# Altium PCB T_B 2.PcbDoc
Units mil, origin at the board's own origin, x right, y up, seen from the top; angles counter-clockwise.
Board outline 5472.44 x 925.2 mil, 2 copper layers (Top Layer, Bottom Layer); 42 components, 28 nets, 106 pads, 33 vias.
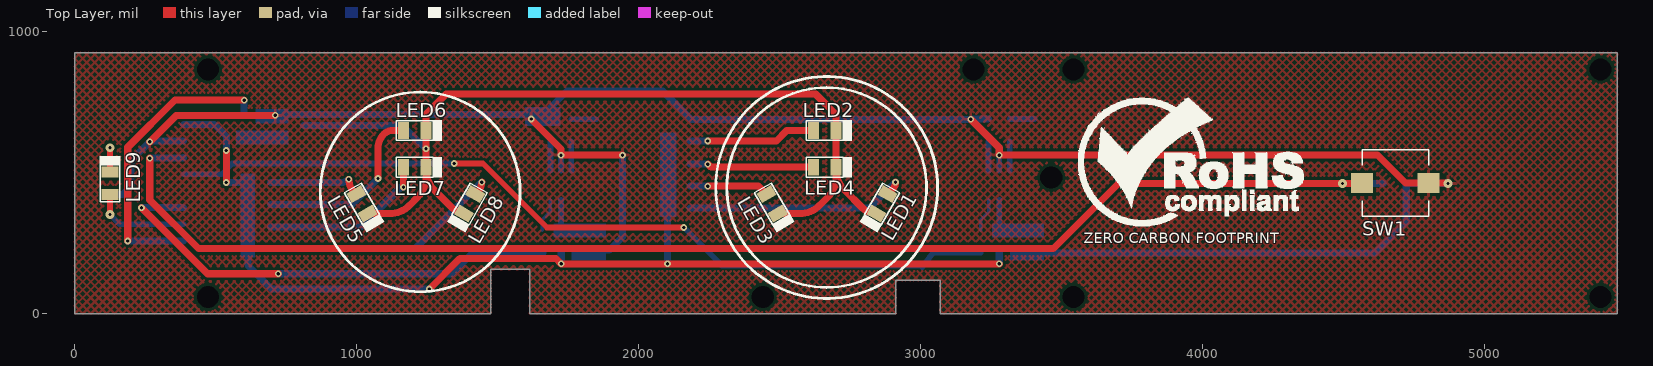
[diagram p0: Top Layer view]
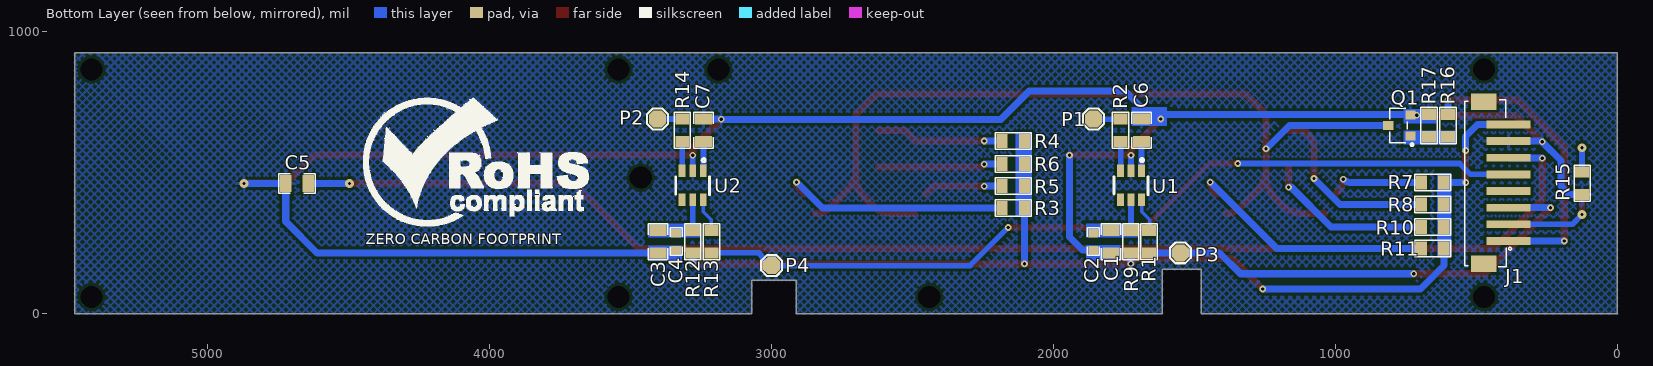
[diagram p1: Bottom Layer view, seen from below]
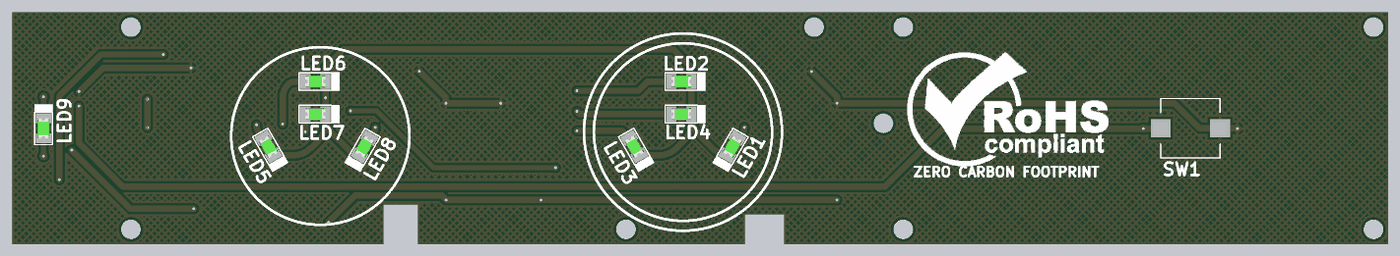
[diagram p2: 3D render of the assembled board from above, using the file's embedded part models]
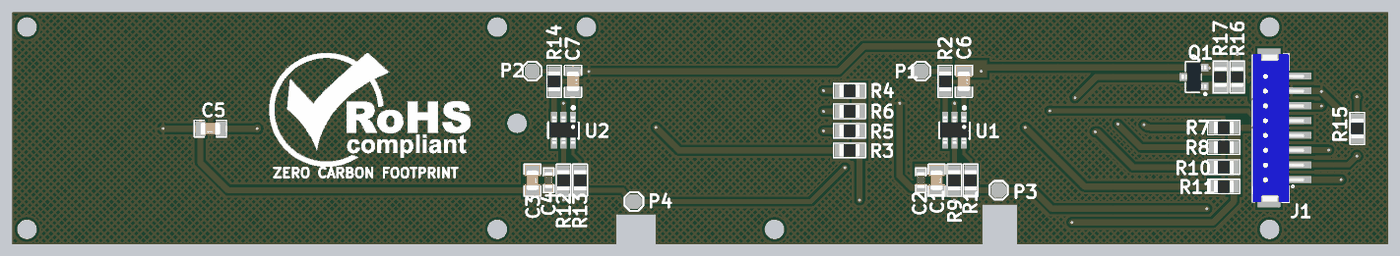
[diagram p3: 3D render of the assembled board from below, using the file's embedded part models]

## Layer stack, top to bottom
Top Solder: solder mask 0.4, Solder Resist, Dk 3.5
Top Layer: signal copper 1.4
Dielectric 1: dielectric 12.6, FR-4, Dk 4.8
Bottom Layer: signal copper 1.4
Bottom Solder: solder mask 0.4, Solder Resist, Dk 3.5

## Board outline
0,-1.2 0,924 5472.44,924 5472.44,-1.2 3070.87,-1.2 3070.87,116.91 2913.39,116.91 2913.39,-1.2 1614.17,-1.2 1614.17,156.28 1476.38,156.28 1476.38,-1.2

## Design rules (kind name [scope] priority, off if disabled: settings)
Clearance [All] p1: gap=10 ignorepadtopadclearanceinfootprint=FALSE except(0: Arc-Hole Track-Hole SMDPad-Hole THPad-Hole Via-Hole Fill-Hole Poly-Hole Region-Hole Text-Hole)
ComponentClearance [All] p1: gap=0 collisioncheckmode=3 verticalgap=0 showdistances=FALSE
HoleSize [All] p1: absolutevalues=TRUE maxlimit=1000 minlimit=1 maxpercent=80.000 minpercent=20.000
HoleToHoleClearance [All] p1: gap=0 allowstackedmicrovias=TRUE
MinimumSolderMaskSliver [All] p1: minsoldermaskwidth=0
PolygonConnect [All] p1: connectstyle=Relief reliefconductorwidth=10 reliefentries=4 polygonreliefangle="90 Angle" airgapwidth=10
RoutingVias [All] p1: holewidth=11.81 width=23.62 viastyle="Through Hole" minholewidth=7.87 minwidth=17.72 maxholewidth=11.81 maxwidth=23.62
SilkToSilkClearance [All] p1: silktosilkclearance=0
SilkToSolderMaskClearance [IsPad] p1: minsilkscreentomaskgap=0 clearancetoexposedcopper=TRUE
SolderMaskExpansion SolderMaskExpansion_1 [IsVia] p1: expansion=4 soldermaskfromhole=TRUE
SolderMaskExpansion [Not IsVia] p2: expansion=4
Width [All] p1: maxlimit=100 minlimit=10 preferedwidth=12 minimp=50.000000 maximp=50.000000 favimp=50.000000
24 further rules are at their usual default settings.

## Classes and differential pairs
component class U_Touch_Sensor_Section: C1 C2 C3 C4 C6 C7 P1 P2 P3 P4 R1 R2 R9 R12 R13 R14 U1 U2
component class U_LED_Section: C5 J1 LED1 LED2 LED3 LED4 LED5 LED6 LED7 LED8 LED9 Q1 R3 R4 R5 R6 R7 R8 R10 R11 R15 R16 SW1

## Components (designator, comment, footprint, x,y, rotation, side; value= is the part's Value field where it differs from the comment)
C1 "0.1uF" Cap0805 1796,254 r270 bottom
C2 "10uF" Cap0603 1859,254 r270 bottom
C3 "0.1uF" Cap0805 3403,254 r270 bottom
C4 "10uF" Cap0603 3339,254 r270 bottom
C5 "0.1uF" Cap0805 4684,460 r0 bottom
C6 "0.1uF" Cap0805 1688,649 r270 bottom
C7 "0.1uF" Cap0805 3242,649 r270 bottom
J1 "B8B-ZR-SM4-TF(LF)(SN)" B8B-ZR-SM4-TF(LF)(SN) 430,462.9 r90 bottom locked
LED1 "150080GS75000" "LED 0805" 2864,388 r240 top
LED2 "150080GS75000" "LED 0805" 2661,648 r0 top
LED3 "150080GS75000" "LED 0805" 2474,388 r300 top
LED4 "150080GS75000" "LED 0805" 2661,518 r0 top
LED5 "150080GS75000" "LED 0805" 1019,388 r300 top
LED6 "150080GS75000" "LED 0805" 1206,648 r0 top
LED7 "150080GS75000" "LED 0805" 1206,518 r0 top
LED8 "150080GS75000" "LED 0805" 1401,388 r240 top
LED9 "150080GS75000" "LED 0805" 125,461 r90 top locked
P1 "Test Point" "TEST POINT" 1858,689 r180 bottom
P2 "Test Point" "TEST POINT" 3405,689 r180 bottom
P3 "Test Point" "TEST POINT" 1550,214 r180 bottom
P4 "Test Point" "TEST POINT" 3000,169 r180 bottom
Q1 "S8050" sot-23 773,666 r90 bottom
R1 "1K" "RES 0805" 1661,254 r90 bottom
R2 "10K" "RES 0805" 1762,649 r270 bottom
R3 "100R" "RES 0805" 2143,373 r180 bottom
R4 "100R" "RES 0805" 2143,611 r180 bottom
R5 "100R" "RES 0805" 2143,451 r180 bottom
R6 "100R" "RES 0805" 2143,529 r180 bottom
R7 "100R" "RES 0805" 655,464 r180 bottom
R8 "100R" "RES 0805" 655,386 r180 bottom
R9 "100R" "RES 0805" 1726,254 r270 bottom
R10 "100R" "RES 0805" 655,306 r180 bottom
R11 "100R" "RES 0805" 655,229 r180 bottom
R12 "100R" "RES 0805" 3280,254 r270 bottom
R13 "10K" "RES 0805" 3214,254 r90 bottom
R14 "1K" "RES 0805" 3317,649 r270 bottom
R15 "100R" "RES 0805" 124,461 r90 bottom
R16 "1K5" "RES 0805" 601,666 r90 bottom
R17 "10K" "RES 0805" 668,666 r90 bottom
SW1 "TVFU03" TVFU03 4685.04,461.4 r0 top locked value=Custom
U1 "RH6015D" SOT-23-6 1725,454 r270 bottom value=Custom
U2 "RH6015D" SOT-23-6 3280,454 r270 bottom value=Custom

## Footprints (in the part's own frame and the unit in brackets; to place one, negate y for a bottom-side part, rotate by r counter-clockwise, add the part's x,y. Pads: shape width x height; smd on the part's side, far side on the other; paste and mask are expansions set on the pad)
B8B-ZR-SM4-TF(LF)(SN) [mm] "ZH Header Male Pin 0.059\"(1.50mm) 8 SMD,P=1.5mm Wire To Board / Wire To Wire Connector RoHS"
  rect 0.7x4 smd: 1(-5.25,-1.125) 2(-3.75,-1.125) 3(-2.25,-1.125) 4(-0.75,-1.125) 5(0.75,-1.125) 6(2.25,-1.125) 7(3.75,-1.125) 8(5.25,-1.125)
  rect 1.5x2.3 smd: MP1(7.3,1.125) MP2(-7.3,1.125)
  silkscreen extent -7.57,-1.4 7.49,2.82, body extent -7.53,-2.41 7.47,2.79, height 5
Cap0603 [mil]
  rect 30x35 smd mask+2.36: 1(-30,0) 2(30,0)
  silkscreen extent -49,-21 49,21, body extent -32,-16 31,16, height 34
Cap0805 [mil] "SMD 0805"
  rect 40x60 smd mask+2.76: 1(-40,0) 2(40,0)
  silkscreen extent -64,-34 64,34, body extent -39,-25 39,25, height 30
"LED 0805" [mil]
  rect 40x60 smd: 1(-39.99,0.01) 2(40.01,0.01)
  silkscreen extent -65,-37 96,37, body extent -40,-25 40,25, height 43
"RES 0805" [mil] "SMD 0805"
  rect 40x50 smd: 1(-40,0) 2(40,0)
  silkscreen extent -64,-29 64,29, body extent -39,-25 39,24, height 24
sot-23 [mm]
  rect 0.82x0.92 smd: 1(-0.95,-1) 2(0.95,-1) 3(0,1)
  silkscreen extent -1.82,-1.23 1.56,0.86, body extent -1.5,-1.25 1.5,1.25, height 1.1
SOT-23-6 [mm] "IC BAT CHG LI-ION 1 CELL SOT23-6"
  rect 1.12x0.62 smd: 1(-1.3,0.95) 2(-1.3,0) 3(-1.3,-0.95) 4(1.3,-0.95) 5(1.3,0) 6(1.3,0.95)
  silkscreen extent -2.4,-1.52 0.86,1.52, body extent -1.4,-1.45 1.4,1.45, height 1.44
"TEST POINT" [mil]
  oct 60x60 smd: 1(0,0)
  silkscreen extent -37,-37 37,37
TVFU03 [mm]
  rect 2x1.8 smd: 1(-3,0) 2(3,0)
  silkscreen extent -3,-3 3,3

## Part data
C1 C3 C5 C6 C7: library part 0805B104K500CT, "CAP CER 0.1UF 50V X7R 0805", Capacitance=100nF, Case Code (Imperial)=0805, Case Code (Metric)=2012, Dielectric=X7R, Manufacturer="Walsin Technologies", Max Operating Temperature=125°C, Min Operating Temperature=-55°C, Supplier Part Number 1=1292-1647-1-ND, Tolerance=10%, Voltage=50V, Case/Package=0805, Category="Ceramic Capacitors", ComponentLink1Description=http://www.farnell.com/datasheets/2340522.pdf?src-supplier=Farnell, ComponentLink1URL=http://www.farnell.com/datasheets/2340522.pdf?src-supplier=Farnell, ComponentLink2Description=http://components.arrow.com/part/dataview/0323_00650840?src-supplier=Arrow+Europe, ComponentLink2URL=http://components.arrow.com/part/dataview/0323_00650840?src-supplier=Arrow+Europe, ComponentLink3Description=https://www.verical.com/server-webapp/html/getDatasheet?partID=414849&src-supplier=Verical, ComponentLink3URL=https://www.verical.com/server-webapp/html/getDatasheet?partID=414849&src-supplier=Verical, ComponentLink4Description=http://www.farnell.com/datasheets/2340522.pdf?src-supplier=Element14, ComponentLink4URL=http://www.farnell.com/datasheets/2340522.pdf?src-supplier=Element14, ComponentLink5Description=http://www.passivecomponent.com/wp-content/uploads/2018/10/MLCC.pdf?src-supplier=Digi-Key, ComponentLink5URL=http://www.passivecomponent.com/wp-content/uploads/2018/10/MLCC.pdf?src-supplier=Digi-Key, ComponentLink6Description=http://www.passivecomponent.com/indexsea/0805B104K500CT-IB.pdf?src-supplier=Digi-Key, ComponentLink6URL=http://www.passivecomponent.com/indexsea/0805B104K500CT-IB.pdf?src-supplier=Digi-Key, ComponentLink7Description=http://www.farnell.com/datasheets/2340522.pdf?src-supplier=Newark, ComponentLink7URL=http://www.farnell.com/datasheets/2340522.pdf?src-supplier=Newark, Depth=1.25mm, Lead Free="Lead Free", Length=2mm, Manufacturer Part Number=0805B104K500CT, Packaging="Tape and Reel", Pricing 1="1=0.12000, 10=0.08600, 50=0.04900, 100=0.04050, 500=0.02842, 1000=0.02352 (USD)", Radiation Hardening=No, REACH SVHC=Unknown, RoHS=Yes, Stock 1=1274242, Supplier 1=Digi-Key, Voltage Rating=50V, Voltage Rating (DC)=50V
C2 C4: library part C1608X5R1E106M080AC, "CAP CER 10UF 25V X5R 0603", Case Code (Imperial)=0603, Case Code (Metric)=1608, Dielectric=X5R, Dielectric Material=Ceramic, Manufacturer=TDK, Max Operating Temperature=85°C, Min Operating Temperature=-55°C, Package Quantity=1, Supplier Part Number 1=445-9015-1-ND, Tolerance=20%, Voltage Rating=25V, Capacitance=10uF, Case/Package=0603, Category="Ceramic Capacitors", ComponentLink1Description=http://components.arrow.com/part/dataview/0323_06887183?src-supplier=Arrow+Europe, ComponentLink1URL=http://components.arrow.com/part/dataview/0323_06887183?src-supplier=Arrow+Europe, ComponentLink2Description=http://www.farnell.com/datasheets/2792994.pdf?src-supplier=Farnell, ComponentLink2URL=http://www.farnell.com/datasheets/2792994.pdf?src-supplier=Farnell, ComponentLink3Description=http://www.farnell.com/datasheets/2291921.pdf?src-supplier=Avnet, ComponentLink3URL=http://www.farnell.com/datasheets/2291921.pdf?src-supplier=Avnet, ComponentLink4Description=http://www.farnell.com/datasheets/1470445.pdf?src-supplier=Newark, ComponentLink4URL=http://www.farnell.com/datasheets/1470445.pdf?src-supplier=Newark, ComponentLink5Description=http://www.farnell.com/datasheets/2291921.pdf?src-supplier=Newark, ComponentLink5URL=http://www.farnell.com/datasheets/2291921.pdf?src-supplier=Newark, ComponentLink6Description=http://www.farnell.com/datasheets/2792994.pdf?src-supplier=Element14, ComponentLink6URL=http://www.farnell.com/datasheets/2792994.pdf?src-supplier=Element14, ComponentLink7Description=http://www.farnell.com/datasheets/1913358.pdf?src-supplier=Element14, ComponentLink7URL=http://www.farnell.com/datasheets/1913358.pdf?src-supplier=Element14, ComponentLink8Description=https://product.tdk.com/info/en/catalog/datasheets/mlcc_commercial_general_en.pdf?src-supplier=Digi-Key, ComponentLink8URL=https://product.tdk.com/info/en/catalog/datasheets/mlcc_commercial_general_en.pdf?src-supplier=Digi-Key, ComponentLink9Description=http://www.farnell.com/datasheets/2291921.pdf?src-supplier=RSComponents, ComponentLink9URL=http://www.farnell.com/datasheets/2291921.pdf?src-supplier=RSComponents, ComponentLink10Description=http://www.farnell.com/datasheets/2291921.pdf?src-supplier=Verical, ComponentLink10URL=http://www.farnell.com/datasheets/2291921.pdf?src-supplier=Verical, ComponentLink11Description=http://www.farnell.com/datasheets/2291921.pdf?src-supplier=Mouser, ComponentLink11URL=http://www.farnell.com/datasheets/2291921.pdf?src-supplier=Mouser, ComponentLink12Description=http://www.farnell.com/datasheets/2792994.pdf?src-supplier=Newark, ComponentLink12URL=http://www.farnell.com/datasheets/2792994.pdf?src-supplier=Newark, ComponentLink13Description=http://www.farnell.com/datasheets/2291921.pdf?src-supplier=Quest, ComponentLink13URL=http://www.farnell.com/datasheets/2291921.pdf?src-supplier=Quest, ComponentLink14Description=http://www.farnell.com/datasheets/2291921.pdf?src-supplier=TTI, ComponentLink14URL=http://www.farnell.com/datasheets/2291921.pdf?src-supplier=TTI, Construction=Flat, Depth=0.8mm, Height=0.8mm, Lead Free="Lead Free", Length=1.6mm, Manufacturer Part Number=C1608X5R1E106M080AC, Mount="Surface Mount", Packaging="Tape and Reel", Pricing 1="1=0.86000, 10=0.60700, 50=0.45920, 100=0.39990, 500=0.29624, 1000=0.25180 (USD)", REACH SVHC="No SVHC", Resistor Type=Ceramic, RoHS=Yes, RoHS Compliant=Yes, Series=C, Stock 1=217631, Supplier 1=Digi-Key, Termination=SMD/SMT, Thickness=0.039inch, Voltage Rating (DC)=25V, Weight=7.1E-05oz, Width=0.8mm
J1: "Conn Shrouded Header HDR 8 POS 1.5mm Solder ST SMD T/R", Color=Natural, Contact Resistance=30mR, Current Rating=1A, Housing Color=Beige, Manufacturer=JST, Max Operating Temperature=85°C, Max Voltage Rating (AC)=50V, Min Operating Temperature=-25°C, Supplier Part Number 1=455-1687-1-ND, Category="Board to Board Connectors", ComponentLink1Description=https://datasheet.ciiva.com/26894/getdatasheetpartid-640747-26894507.pdf?src-supplier=Verical, ComponentLink1URL=https://datasheet.ciiva.com/26894/getdatasheetpartid-640747-26894507.pdf?src-supplier=Verical, ComponentLink2Description=https://datasheet.ciiva.com/16418/ezr-16418253.pdf?src-supplier=Future+Electronics, ComponentLink2URL=https://datasheet.ciiva.com/16418/ezr-16418253.pdf?src-supplier=Future+Electronics, Connector Type="Male Pin", Contact Material=Tin,Brass, Contact Plating=Tin,Copper, Depth=6.5mm, Fastening Type=Detent, Gender=Male, Height=7.2mm, Housing Material=Polyamide, Lead Free="Lead Free", Length=15mm, Manufacturer Part Number=B8B-ZR-SM4-TF(LF)(SN), Max Current Rating=1A, Mount="Surface Mount", Number of Contacts=8, Number of Positions=8, Number of Rows=1, Orientation="Right Angle", Packaging="Tape and Reel", Pitch=1.5mm, Pricing 1="1=0.80000, 10=0.70700, 100=0.60970, 500=0.49886 (USD)", RoHS=Yes, Supplier 1=Digi-Key, Termination=Solder, Width=3.5mm
LED1 LED2 LED3 LED4 LED5 LED6 LED7 LED8 LED9: "LED GREEN CLEAR 0805 SMD", Case Code (Imperial)=0805, Case Code (Metric)=2012, Color=Green, Forward Current=30mA, Forward Voltage=3.2V, Manufacturer="Wurth Electronics", Max Operating Temperature=85°C, Min Operating Temperature=-40°C, Package Quantity=4000, Supplier Part Number 1=732-4983-1-ND, Test Current=20mA, Case/Package=0805, Category=LEDs, ComponentLink1Description=https://datasheet.ciiva.com/29563/150080gs75000-29563008.pdf?src-supplier=Digi-Key, ComponentLink1URL=https://datasheet.ciiva.com/29563/150080gs75000-29563008.pdf?src-supplier=Digi-Key, ComponentLink2Description=https://datasheet.ciiva.com/29279/759434-da-01-en-chipled-0805-w-kl-gruen-150080gs75000-29279039.pdf?src-supplier=Conrad, ComponentLink2URL=https://datasheet.ciiva.com/29279/759434-da-01-en-chipled-0805-w-kl-gruen-150080gs75000-29279039.pdf?src-supplier=Conrad, Dominant Wavelength=520nm, Height=0.7mm, Length=2mm, Lens Style=Clear,Rectangular, Luminous Intensity=450mcd, Manufacturer Part Number=150080GS75000, Mount="Surface Mount", Packaging="Cut Tape", Pricing 1="1=0.18000, 50=0.16500, 100=0.14200, 500=0.12300 (USD)", REACH SVHC=Unknown, RoHS=Yes, RoHS Compliant=Yes, Stock 1=96823, Supplier 1=Digi-Key, Viewing Angle=140°, Wavelength=520nm, Width=1.25mm
P1 P2 P3 P4: library part "TEST POINT", "Test Point ON"
Q1: "NPN 500mA 25V 300mW SOT-23(SOT-23-3) Bipolar Transistors - BJT RoHS", Current - Collector (Ic) (Max)=500mA, Manufacturer=Shikues, Package=SOT-23(SOT-23-3), Power-max=300mW, Voltage - Collector Emitter Breakdown (Max)=25V, Transistor Type=NPN
R1 R14: library part CRCW08051K00JNEB, "RES SMD 1K OHM 5% 1/8W 0805", Case Code (Imperial)=0805, Case Code (Metric)=2012, Manufacturer="Vishay Dale", Max Operating Temperature=155°C, Max Power Dissipation=125mW, Min Operating Temperature=-55°C, Package Quantity=10000, Resistance=1kR, Resistor Type="Thick Film", Supplier Part Number 1=541-CRCW08051K00JNEBCT-ND, Temperature Coefficient=200ppm/°C, Tolerance=5%, Voltage Rating=150V, Case/Package=0805, Category="Chip SMD Resistors", ComponentLink1Description=https://datasheet.ciiva.com/5548/dcrcwe3-109170-5548326.pdf?src-supplier=Mouser, ComponentLink1URL=https://datasheet.ciiva.com/5548/dcrcwe3-109170-5548326.pdf?src-supplier=Mouser, ComponentLink2Description=https://datasheet.ciiva.com/28621/1747939-28621434.pdf?src-supplier=Element14, ComponentLink2URL=https://datasheet.ciiva.com/28621/1747939-28621434.pdf?src-supplier=Element14, Contact Plating=Tin, Features="Automotive AEC-Q200", Height=0.02inch, Lead Free="Lead Free", Length=0.079inch, Manufacturer Part Number=CRCW08051K00JNEB, Number of Pins=2, Number of Terminations=2, Packaging="Tape and Reel", Power Rating=125mW, Pricing 1="1=0.10000, 10=0.05000, 100=0.02040, 1000=0.00914, 2500=0.00794, 5000=0.00656 (USD)", Radiation Hardening=No, REACH SVHC=Unknown, RoHS=Yes, Stock 1=4389, Supplier 1=Digi-Key, Termination=SMD/SMT, Voltage Rating (DC)=150V, Weight=0.000194oz, Width=0.049inch
R2 R13 R17: library part RMCF0805FT10K0, "RES 10K OHM 1% 1/8W 0805", Case Code (Imperial)=0805, Case Code (Metric)=2012, Manufacturer="Stackpole Electronics", Max Operating Temperature=155°C, Max Power Dissipation=125mW, Min Operating Temperature=-55°C, Resistance=10kR, Resistor Type="Thick Film", Supplier Part Number 1=RMCF0805FT10K0CT-ND, Temperature Coefficient=100ppm/°C, Tolerance=1%, Case/Package=0805, Category="Chip SMD Resistors", ComponentLink1Description=https://datasheet.ciiva.com/15193/getdatasheetpartid-362046-15193525.pdf?src-supplier=Verical, ComponentLink1URL=https://datasheet.ciiva.com/15193/getdatasheetpartid-362046-15193525.pdf?src-supplier=Verical, Construction=Rectangular, Contact Plating=Tin,Matte, Depth=1.25mm, Features="Automotive AEC-Q200", Height=0.026inch, Lead Free="Lead Free", Length=2mm, Manufacturer Part Number=RMCF0805FT10K0, Military Standard=Not, Mount="Surface Mount", Number of Terminations=2, Packaging="Tape and Reel", Power Rating=125mW, Pricing 1="1=0.10000, 10=0.02700, 100=0.01090, 1000=0.00488, 2500=0.00423 (USD)", Radiation Hardening=No, RoHS=Yes, RoHS Compliant=Yes, Series=RMCF, Size Code=0805, Stock 1=308321, Supplier 1=Digi-Key, Width=0.049inch
R3 R4 R5 R6 R7 R8 R9 R10 R11 R12 R15: library part ERA6VEB1000V, "Res SMD 100 Ohm 0.10% 1/8W 0805", Manufacturer=Panasonic, Manufacturer Part Number=ERA-6VEB1000V, Supplier Part Number 1=10-ERA-6VEB1000VCT-ND, Category="Chip SMD Resistors", Pricing 1="1=0.56000, 10=0.46700, 100=0.31350, 1000=0.18342, 2500=0.18142 (USD)", RoHS=No, Stock 1=2703, Supplier 1=Digi-Key
R16: library part RC0805JR-071K5L, "RES SMD 1K5 0.125W ±5% 0805", Case Code (Imperial)=0805, Case Code (Metric)=2012, Manufacturer=Yageo, Max Operating Temperature=155°C, Max Power Dissipation=125mW, Min Operating Temperature=-55°C, Package Quantity=1, Resistance=1.5kR, Resistance Tolerance=5%, Resistor Type="Thick Film", Supplier Part Number 1=1655711, Temperature Coefficient=100ppm/°C, Voltage Rating=150V, Case/Package=0805, Category="Chip SMD Resistors", ComponentLink1Description=https://datasheet.ciiva.com/2456/pyu-r-int-thick-7-2456073.pdf?src-supplier=Digi-Key, ComponentLink1URL=https://datasheet.ciiva.com/2456/pyu-r-int-thick-7-2456073.pdf?src-supplier=Digi-Key, ComponentLink2Description=https://datasheet.ciiva.com/2456/pyu-r-int-thick-7-2456074.pdf?src-supplier=Digi-Key, ComponentLink2URL=https://datasheet.ciiva.com/2456/pyu-r-int-thick-7-2456074.pdf?src-supplier=Digi-Key, ComponentLink3Description=https://datasheet.ciiva.com/17026/rc0805-17026842.pdf?src-supplier=Future+Electronics, ComponentLink3URL=https://datasheet.ciiva.com/17026/rc0805-17026842.pdf?src-supplier=Future+Electronics, ComponentLink4Description=https://datasheet.ciiva.com/46395/444164-46395130.pdf?src-supplier=Element14, ComponentLink4URL=https://datasheet.ciiva.com/46395/444164-46395130.pdf?src-supplier=Element14, ComponentLink5Description=https://datasheet.ciiva.com/2456/pyu-r-int-thick-7-2456075.pdf?src-supplier=Digi-Key, ComponentLink5URL=https://datasheet.ciiva.com/2456/pyu-r-int-thick-7-2456075.pdf?src-supplier=Digi-Key, Construction=Rectangular, Contact Plating=Tin,Matte,Lead, Depth=1.25mm, Features="Moisture Resistant", Height=0.024inch, Lead Free="Lead Free", Length=0.079inch, Manufacturer Part Number=RC0805JR-071K5L, Military Standard=Not, Number of Terminations=2, Packaging="Tape and Reel", Power Rating=125mW, Pricing 1="5000=0.00390, 20000=0.00330, 75000=0.00320, 125000=0.00320, 250000=0.00310 (USD)", Radiation Hardening=No, REACH SVHC=Unknown, RoHS=Yes, RoHS Compliant=Yes, Series=RC, Size Code=0805, Stock 1=115000, Supplier 1="Future Electronics", Termination=SMD/SMT, Tolerance=5%, Width=0.049inch
SW1: "6mm 2 pin smd soft touch long travel silent tact switch", Manufacturer="Zhejiang, China", Package=Custom, ComponentLink1Description="Supplier Link", ComponentLink1URL=https://www.alibaba.com/product-detail/6mm-2-pin-smd-soft-touch_324641074.html, Manufacturer Part No=TVFU03
U1 U2: "SOT-23-6L Touch Sensors RoHS", Manufacturer="RONGHE Microelectronics", Package=SOT-23-6, Manufacturer Part No=RH6015D

## Free pads (board coordinates)
  round 0 hole 78.74 unplated: 1(5413.39,864.94) 2(3188.98,864.94) 3(3543.31,864.94) 4(5413.39,57.86) 5(3464.57,481.09) 6(3543.31,57.86) 8(2440.95,57.86) 9(472.44,864.94) 10(472.44,57.86)

## Via types
v1: diameter 23.62, hole 11.81, Top Layer to Bottom Layer, tented both sides, 29 vias
v2: diameter 31.5, hole 11.81, Top Layer to Bottom Layer, tented both sides, 4 vias

## Nets (pads, with @x,y where several pads share a name; then routed paths per layer and width w, separated by ;. In a path a pad name is that pad's centre, name@x,y a point inside that pad or via, vN(x,y) a via of type N, cw(c..) or ccw(c..) an arc to the next point about the centre after c; other vN are vias at no path point)
3V3: J1.8 R3.2 R4.2 R5.2 R6.2 R7.2 R8.2 R9.2 R10.2 R11.2 R12.2 | length 3498.1
  Top Layer w25: v1(538,463.9) v1(538,577) ; v1(1258,86) 1366,194 1707,194 v1(1726,175) v1(2103,175) v1(3280,175)
  Bottom Layer w25: J1.8 495.41,669.59 538,627 v1(538,577) ; v1(538,463.9) 614.9,463.9 R7.2 ; R11.2 615,169 698,86 v1(1258,86) ; v1(1726,175) R9.2 ; v1(2103,175) R3.2 ; v1(3280,175) R12.2
B_LED: J1.2 LED9.1 | length 346.1
  Top Layer w20: v2(125,350) LED9.1
  Bottom Layer w20: v2(125,350) 159.74,315.26 J1.2
BJT_C: LED1.2 LED2.2 LED3.2 LED4.2 LED5.2 LED6.2 LED7.2 LED8.2 Q1.3 | length 3399.1
  Top Layer w25: LED5.2 1116.94,353.36 ccw(c1116.94,453.36) 1187.65,382.65 1216.72,411.72 ccw(c1146.01,482.43) 1246.01,482.43 ; LED7.2@1246.01,508.41 ccw(c1346.01,508.41) 1275.3,437.7 1338.89,374.11 ccw(c1389,424.21) LED8.2@1389,353.35 ; LED7.2 v1(1246.01,583) LED6.2 1246.01,706.01 1317,777 2629,777 2701.01,704.99 LED2.2 LED4.2 LED4.2@2701.01,508.41 ; LED8.2@1375.19,353.35 LED8.2 ; LED3.2 2571.94,353.36 ccw(c2571.94,453.36) 2642.65,382.65 2671.72,411.72 ccw(c2601.01,482.43) 2701.01,482.43 LED4.2@2701.01,508.41 ; LED1.2 cw(c2844,424.21) 2793.89,374.11 2730.3,437.7 cw(c2801.01,508.41) LED4.2@2701.01,508.41
  Bottom Layer w25: Q1.3 1163.01,666 v1(1246.01,583)
GND: C1.2 C2.2 C3.2 C4.2 C5.2 C6.1 C7.1 J1.7 Q1.2 R15.1 R17.2 SW1.2 U1.2 U2.2 | length 7894.8
  Top Layer w25: v1(266,608) 360,702 v1(711,702) ; v1(1619,689) 1725,583 v1(1725,561) v1(1943,561) ; v1(3179,688) 3280,587 v1(3280,561) 4622,561 4721.6,461.4 SW1.2 4870.6,461.4 v2(4872,460)
  Bottom Layer w20: U1.2 v1(1725,561) ; U2.2 v1(3280,561)
  Bottom Layer w25: R15.1 170,421 200,451 200,542 v1(266,608) 268.54,610.54 J1.7 ; Q1.2 733.63,704.64 1603.36,704.64 v1(1619,689) C6.1 1688,730 1746,788 2086,788 2186,688 v1(3179,688) 3180,689 C7.1 ; C2.2 1897,224 1943,270 v1(1943,561) ; C4.2 3393,224 C3.2 ; C3.2@3425,214 4613,214 4724,325 C5.2 v2(4872,460)
NetC6_2: C6.2 U1.1 | length 104
  Bottom Layer w20: U1.1 1688,505.58 C6.2
NetC7_2: C7.2 U2.1 | length 104.1
  Bottom Layer w20: C7.2 3242,505.78 U2.1
NetLED1_1: LED1.1 R3.1 | length 820.3
  Top Layer w25: LED1.1 2901.84,440.47 ccw(c2877.31,465) v1(2912,465)
  Bottom Layer w25: R3.1@2182.34,372.86 2819.86,372.86 v1(2912,465)
NetLED2_1: LED2.1 R4.1 | length 453.3
  Top Layer w25: v1(2246,611) 2489,611 2526.01,648.01 LED2.1
  Bottom Layer w25: R4.1 v1(2246,611)
NetLED3_1: LED3.1 R5.1 | length 282.8
  Top Layer w25: v1(2246,451) 2425.65,451 LED3.1
  Bottom Layer w25: R5.1 v1(2246,451)
NetLED4_1: LED4.1 R6.1 | length 442.6
  Top Layer w25: v1(2246,529) 2256.99,518.01 LED4.1
  Bottom Layer w25: R6.1 v1(2246,529)
NetLED5_1: LED5.1 R7.1 | length 340.9
  Top Layer w25: v1(972,475) ccw(c1033.21,475) 989.93,431.72 LED5.1
  Bottom Layer w25: R7.1 945.44,464 ccw(c945.44,501.56) v1(972,475)
NetLED6_1: LED6.1 R8.1 | length 654.9
  Top Layer w25: v1(1076,478) 1076,585.3 cw(c1147.7,585.3) 1097,636 cw(c1125.99,607.01) 1125.99,648.01 LED6.1
  Bottom Layer w25: R8.1 984,386 v1(1076,478)
NetLED7_1: LED7.1 R10.1 | length 600.4
  Top Layer w25: v1(1166,447) LED7.1
  Bottom Layer w25: R10.1 1015.42,306 1156.42,447 v1(1166,447)
NetLED8_1: LED8.1 R11.1 | length 896.6
  Top Layer w25: LED8.1 1430.3,431.93 ccw(c1397.24,465) v1(1444,465)
  Bottom Layer w25: R11.1 1208,229 v1(1444,465)
NetLED9_2: LED9.2 R15.2 | length 172.4
  Top Layer w20: LED9.2 v2(125,587)
  Bottom Layer w12: R15.2 R15.2@125,502
  Bottom Layer w20: R15.2@125,502 v2(125,587)
NetP1_1: P1.1 R2.1 | length 88
  Bottom Layer w20: R2.1@1762.14,688.34 P1.1@1850.14,688.34
NetP2_1: P2.1 R14.1 | length 88
  Bottom Layer w20: R14.1 P2.1
NetQ1_1: Q1.1 R16.1 R17.1 | length 67
  Bottom Layer w25: R16.1 R17.1
NetR1_2: R1.2 U1.6 | length 120.7
  Bottom Layer w12: R1.2@1659,294 1659,331 1687.6,359.6 U1.6
NetR2_2: R2.2 U1.3 | length 104
  Bottom Layer w20: R2.2 1762,505.58 U1.3
NetR13_2: R13.2 U2.6 | length 120.7
  Bottom Layer w12: R13.2 3214,331 3242.6,359.6 U2.6
NetR14_2: R14.2 U2.3 | length 104
  Bottom Layer w20: R14.2 3317.4,608.6 U2.3
PLAY_KEY: C5.1 J1.6 SW1.1 | length 4883.2
  Top Layer w25: v1(266,550) 266,402 439,229 3472,229 3703,460 v2(4498,460) 4565.53,460 SW1.1
  Bottom Layer w25: v1(266,550) 384.23,550 J1.6 ; v2(4498,460) C5.1
T_LED1: J1.1 R16.2 | length 1063
  Top Layer w25: v1(188,256) 188,589 355,756 v1(601,756)
  Bottom Layer w25: v1(188,256) 188.2,256.2 J1.1 ; R16.2 v1(601,756)
TIN_1: C1.1 C2.1 R9.1 U1.5 | length 108.8
  Bottom Layer w20: R9.1@1725,294 U1.5
TIN_2: C3.1 C4.1 R12.1 U2.5 | length 172
  Bottom Layer w20: R12.1 U2.5
  Bottom Layer w25: R12.1 3329,294 C4.1
TKEY1: J1.3 P3.1 R1.1 | length 1700.4
  Top Layer w25: v1(237,374.32) 471.32,140 v1(722,140)
  Bottom Layer w25: v1(237,374.32) J1.3 ; v1(722,140) 1337,140 1411,214 P3.1 R1.1
TKEY2: J1.5 P4.1 R13.1 | length 3012.3
  Top Layer w20: v1(1346,531) 1448,531 1675,304 v1(2161,304)
  Bottom Layer w20: J1.5 520.43,492.43 559,531 v1(1346,531) ; v1(2161,304) 2296,169 P4.1 ; P4.1@3006.95,163.74 3045,214 R13.1
pads on no net: J1.4 J1.MP1 J1.MP2 U1.4 U2.4

## Polygon pours and split planes (outlines as drawn)
GND on Top Layer "GND_L01_P000" (hatched 45Degree grid 20 track 8, remove dead copper, pour order 0): 0,924 5472.44,924 5472.44,-1.2 0,-1.2
GND on Bottom Layer "GND_L02_P002" (hatched 45Degree grid 20 track 8, remove dead copper, pour order 2): 0,923 5472.44,923 5472.44,-2.2 0,-2.2

## Other copper
Top Layer:
  pour cut-out: 2913,-6 2913,117.28 3070.87,117.28 3070.87,-6
  pour cut-out: 1476.38,-6 1476.38,156.28 1614.17,156.28 1614.17,-6
Bottom Layer:
  rectangle net GND: 1597,664 1724,732
  region net 3V3: 638.6,197 638.6,495.37 587.6,495.37 587.6,197
  rectangle net GND: 641,672.8 758,723.8
  rectangle net NetQ1_1: 572,598 758,649
  rectangle net TIN_1: 1698.86,268.66 1883.86,318.66
  rectangle net GND: 1762.26,187.66 1883.86,241.66
  rectangle net 3V3: 2077,342 2134,642
  rectangle net GND: 3317.4,187 3439,241
  rectangle net TIN_2: 3254,268 3439,318
  pour cut-out: 2913,-6 2913,117.28 3070.87,117.28 3070.87,-6
  pour cut-out: 1476.38,-6 1476.38,156.28 1614.17,156.28 1614.17,-6

## Silkscreen, mask and mechanical layers (free items; w line width, h text height)
Top Overlay:
  drawing of 3077 lines, arcs and shapes, not listed
  text "ZERO CARBON FOOTPRINT" at 3580,249 h38
Bottom Overlay:
  drawing of 3074 lines, arcs and shapes, not listed
  text "ZERO CARBON FOOTPRINT" at 4440,245 h38
Mechanical 2:
  lines w10: 4685.04,924 5472.44,924 ; 5472.44,924 0,924 0,-1.2 1476.38,-1.2 1476.38,156.28 1614.17,156.28 1614.17,-1.2 2913.39,-1.2 2913.39,116.91 3070.87,116.91 3070.87,-1.2 5472.44,-1.2 5472.44,924